# Altium PCB NEO_LAMP_PCB.PcbDoc
Units mm, origin at the board's own origin, x right, y up, seen from the top; angles counter-clockwise.
Board outline 40 x 40 mm, 2 copper layers (Top Layer, Bottom Layer), stack 1.57 mm thick; 59 components, 42 nets, 210 pads, 48 vias.
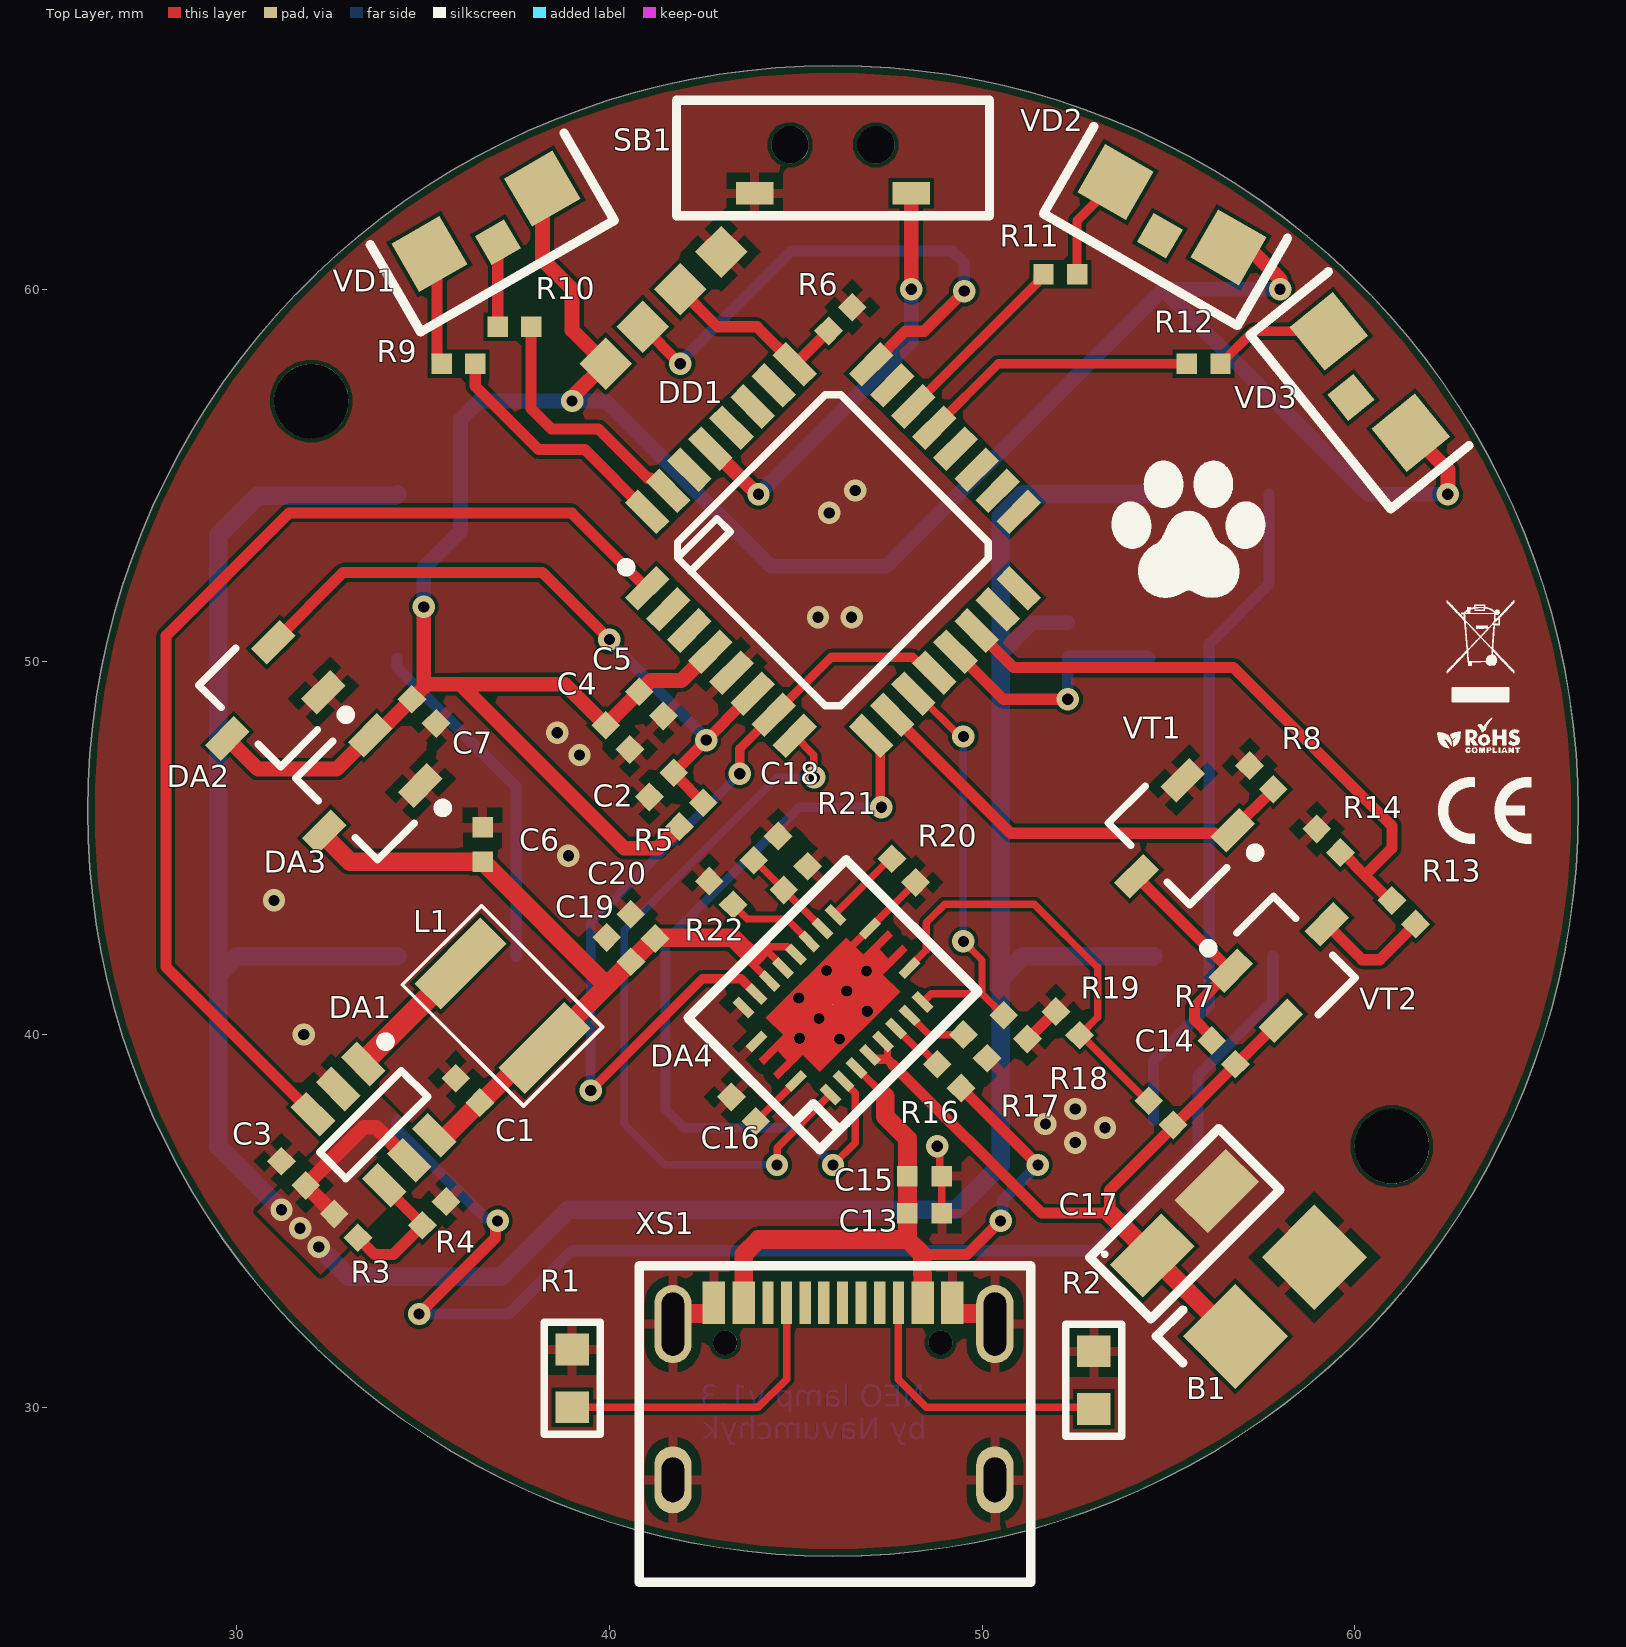
[diagram p0: Top Layer view]
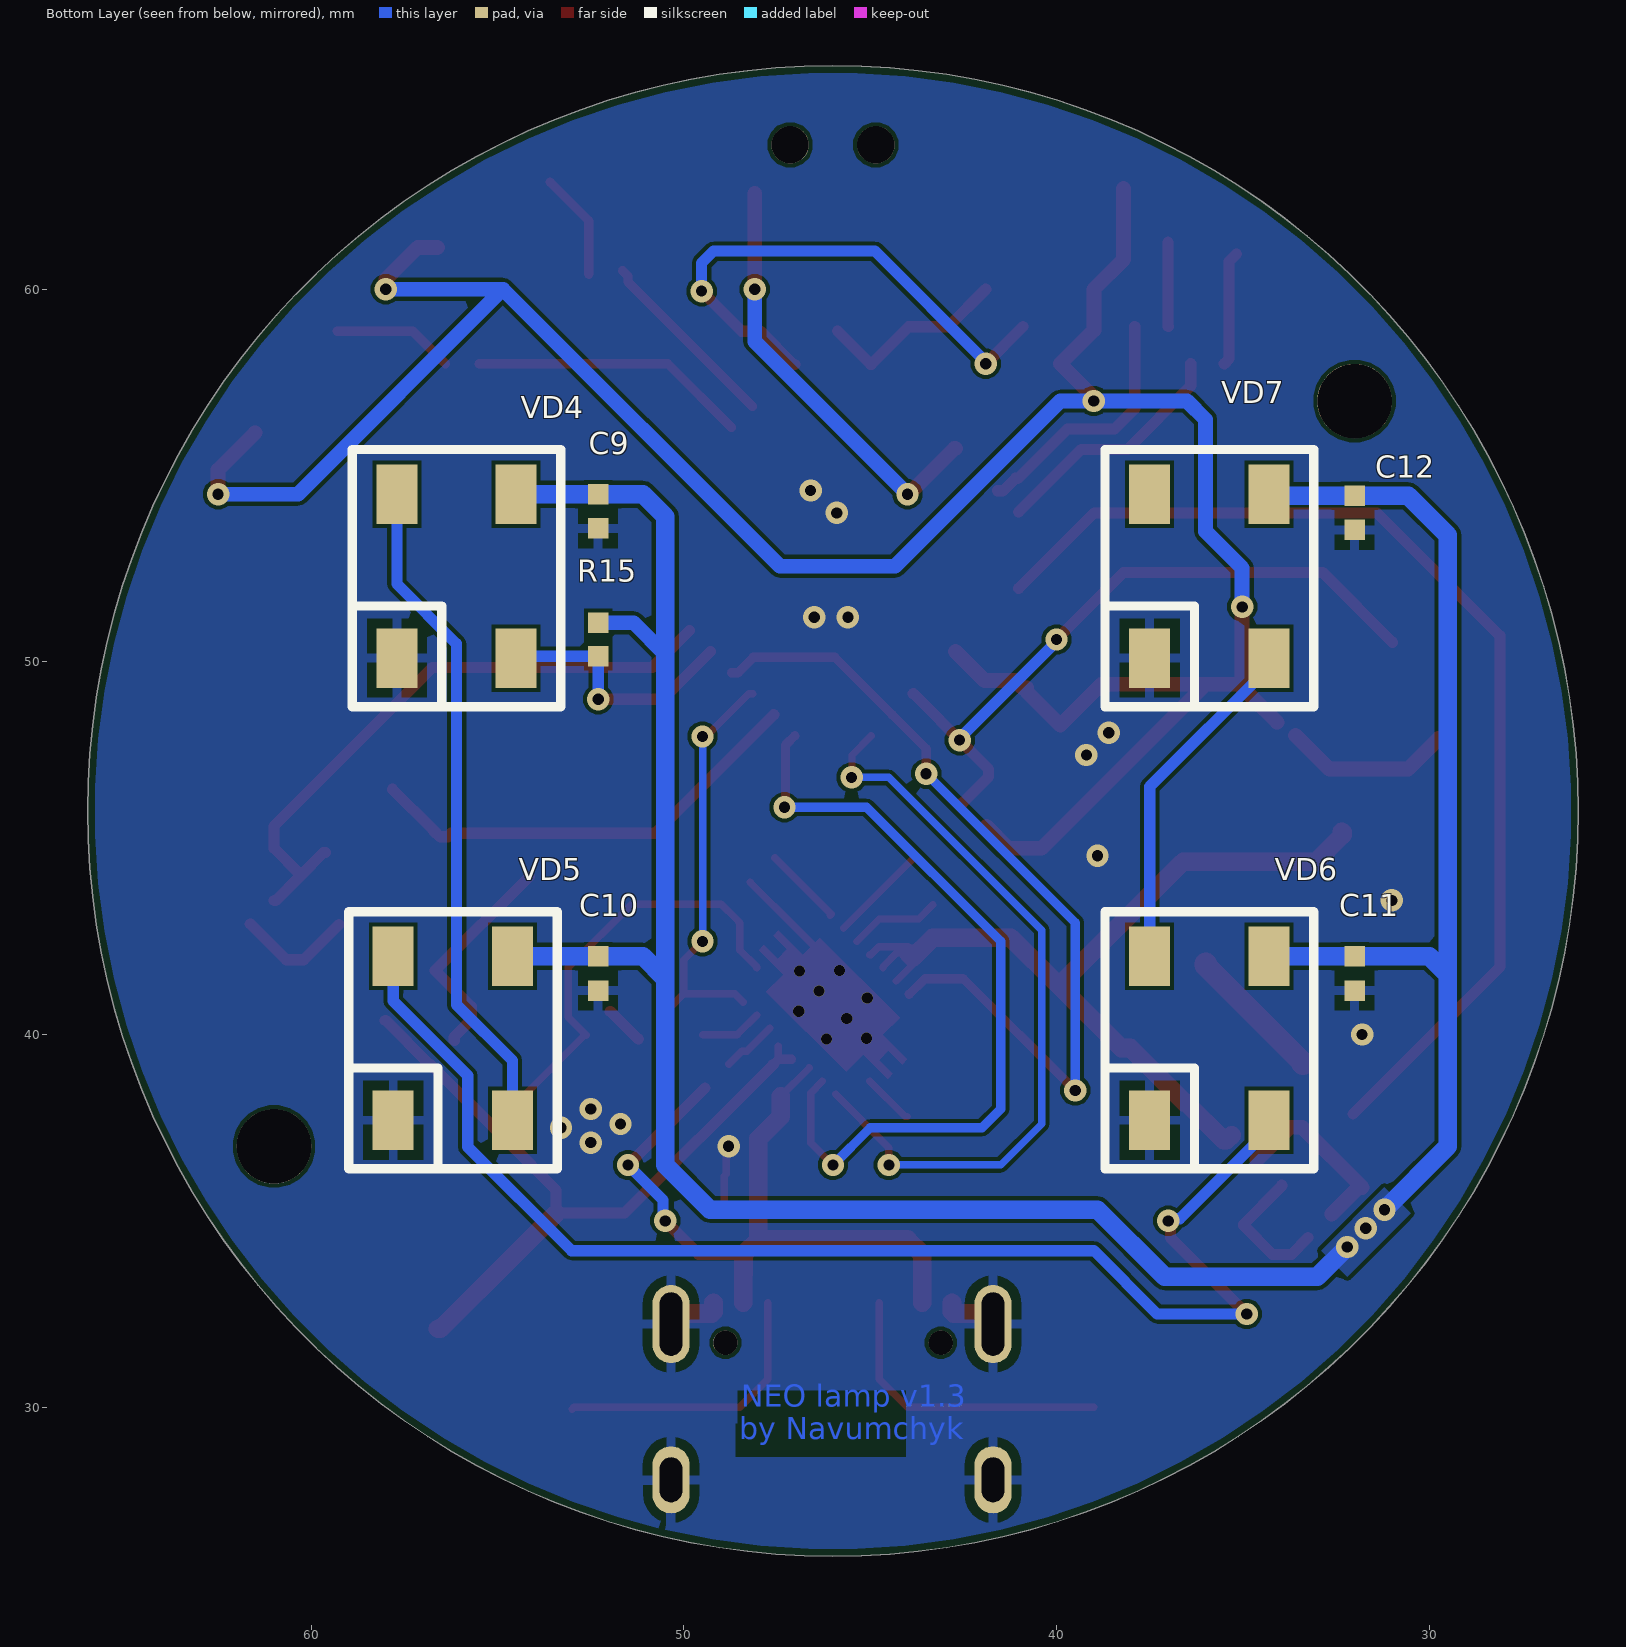
[diagram p1: Bottom Layer view, seen from below]
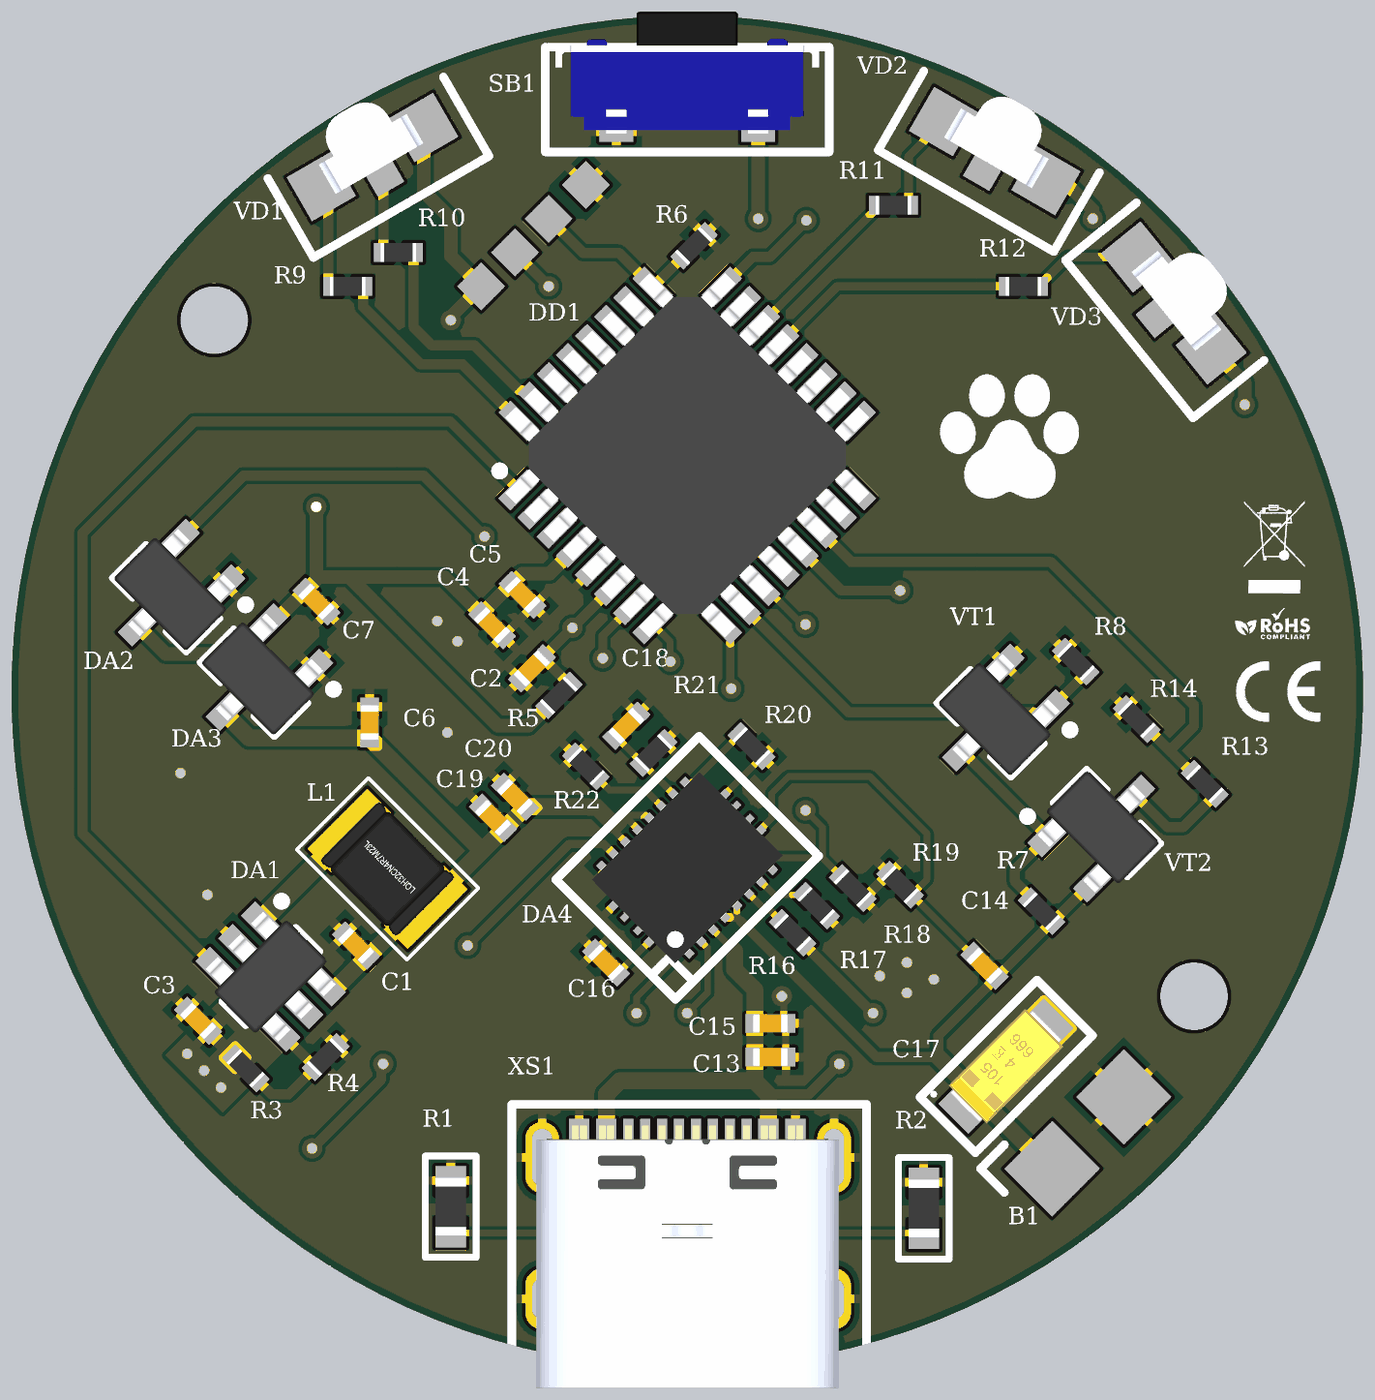
[diagram p2: 3D render of the assembled board from above, using the file's embedded part models]
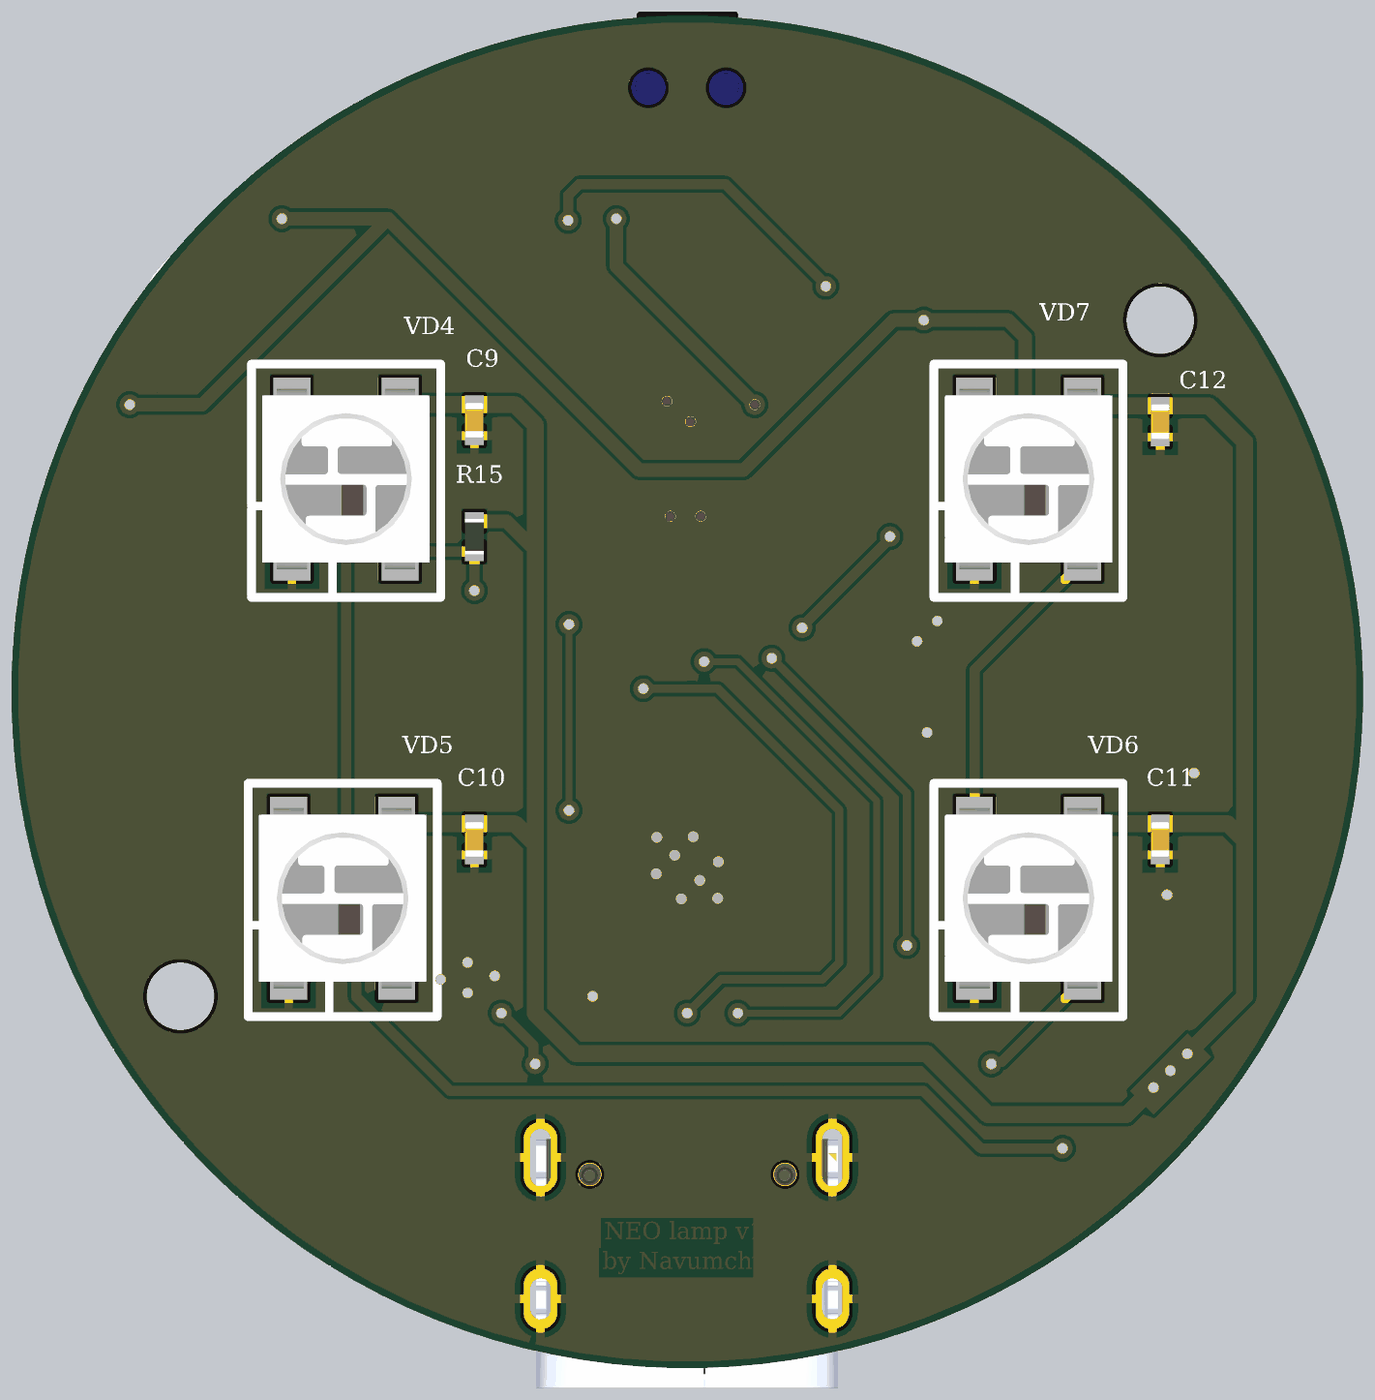
[diagram p3: 3D render of the assembled board from below, using the file's embedded part models]

## Layer stack, top to bottom
Top Solder: solder mask 0.0254, SM-001, Dk 4
Top Layer: signal copper 0.035
Dielectric 1: dielectric 1.5, FR-4, Dk 4.8
Bottom Layer: signal copper 0.035
Bottom Solder: solder mask 0.0254, SM-001, Dk 4

## Board outline
46,26 cw(c46,46) 26,46 cw(c46,46) 46,66 cw(c46,46) 66,46 cw(c46,46)

## Design rules (kind name [scope] priority, off if disabled: settings)
Clearance [All] p1: gap=0.1 ignorepadtopadclearanceinfootprint=FALSE
MinimumSolderMaskSliver [All] p1: minsoldermaskwidth=0.1
PolygonConnect [All] p1: connectstyle=Direct reliefconductorwidth=0.254 reliefentries=4 polygonreliefangle="90 Angle" airgapwidth=0.254
RoutingVias [All] p1: holewidth=0.3 width=0.6 viastyle="Through Hole" minholewidth=0.3 minwidth=0.6 maxholewidth=0.3 maxwidth=0.6
SilkToSolderMaskClearance [IsPad] p1: minsilkscreentomaskgap=0.1 clearancetoexposedcopper=TRUE
SolderMaskExpansion [All] p1: expansion=0.102 istentingtop=FALSE
Width [All] p1: maxlimit=0.6 minlimit=0.2 preferedwidth=0.4
28 further rules are at their usual default settings.

## Classes and differential pairs
component class LEDS: C9 C10 C11 C12 R15 VD4 VD5 VD6 VD7
component class "Control block": C1 C2 C3 C4 C5 C6 C7 DA1 DA2 DA3 DD1 L1 R1 R2 R3 R4 R5 R6 R7 R8 R9 R10 R11 R12 R13 R14 SB1 VD1 VD2 VD3 VT1 VT2 XS1
component class charge_block: B1 C13 C14 C15 C16 C17 C18 C19 C20 DA4 R16 R17 R18 R19 R20 R21 R22

## Components (designator, comment, footprint, x,y, rotation, side; value= is the part's Value field where it differs from the comment)
B1 "BAT" BAT_CONT 56.8,31.9 r45 top
C1 "10u" C0402 36.2,38.5 r315 top
C2 "1uF" C0402 41.4,46.7 r45 top
C3 "10u" C0402 31.525,36.275 r315 top
C4 "4.7u" C0402 40.225,47.975 r315 top
C5 "0.1u" C0402 41.125,48.875 r315 top
C6 "10u" C0402 36.6,45.1 r270 top
C7 "10u" C0402 35.025,48.675 r135 top
C9 "0.1u" C0402 52.3,54.04 r90 bottom locked
C10 "0.1u" C0402 52.3,41.64 r90 bottom locked
C11 "0.1u" C0402 32,41.64 r90 bottom locked
C12 "0.1u" C0402 32,54 r90 bottom locked
C13 "10u" C0402 48.46,35.2 r0 top
C14 "0.22u" C0402 54.8,37.9 r135 top
C15 "0.1u" C0402 48.46,36.2 r0 top
C16 "0.1u" C0402 43.6,38 r135 top
C17 "100u" "CAP TA 3216" 55.434,34.934 r45 top
C18 "0.22u" C0402 44.2,45 r225 top
C19 "10u" C0402 40.254,42.279 r135 top
C20 "0.1u" C0402 40.9,42.9 r135 top
DA1 "TPS61071" SOT23-6 33.674,37.583 r315 top
DA2 "MAX809" SOT23-3 30.7,48.9 r225 top
DA3 "XC6206" SOT23-3 33.3,46.4 r225 top
DA4 "BQ24070RHL" "VQFN20 (3.5*4.5)" 46,40.8 r135 top
DD1 "STM32G030K6T6" LQFP32 46,53 r45 top
L1 "Inductor" LQH32CN100K23 38.263,39.637 r135 top
R1 "5.1k" 0603 39,30.775 r270 top
R2 "5.1k" 0603 53,30.725 r270 top
R3 "1.8M" 0402 32.932,34.868 r315 top
R4 "200k" 0402 35.3,35.2 r225 top
R5 "10k" 0402 42.2,45.9 r45 top
R6 "10k" 0402 46.2,59.2 r225 top
R7 "100k" 0402 56.482,39.518 r315 top
R8 "100 k" 0402 57.5,46.9 r315 top
R9 "1k" 0402 35.95,58 r180 top
R10 "1k" 0402 37.45,59 r180 top
R11 "1k" 0402 52.1,60.4 r0 top
R12 "1k" 0402 55.95,58 r0 top
R13 "10k" 0402 61.318,43.282 r315 top
R14 "10k" 0402 59.3,45.2 r315 top
R15 "10k" 0402 52.3,50.6 r90 bottom
R16 "100k" 0402 49.118,38.882 r135 top
R17 "100k" 0402 49.818,39.682 r135 top
R18 "100k" 0402 50.9,40.2 r135 top
R19 "8.2k" 0402 52.3,40.3 r315 top
R20 "10k" 0402 47.9,44.4 r135 top
R21 "37k" 0402 45,44.2 r225 top
R22 "30k" 0402 43,43.8 r315 top
SB1 "Button" KLS7-TS3606 46,62.575 r0 top
VD1 "LED Duble" APBA3010SYKCGKC-GX 36.684,61.825 r30 top
VD2 "Red" KPA-3010SGC 55.1,62 r330 top
VD3 "Red" KPA-3010SGC 60.405,57.509 r309 top
VD4 "ws2812b 5050" "LED 5050 WS2812B" 54.5,54.5 r270 bottom locked
VD5 "ws2812b 5050" "LED 5050 WS2812B" 54.6,42.1 r270 bottom locked
VD6 "ws2812b 5050" "LED 5050 WS2812B" 34.3,42.1 r270 bottom locked
VD7 "ws2812b 5050" "LED 5050 WS2812B" 34.3,54.5 r270 bottom locked
VT1 "BSS138" SOT23-3 55.1,45.2 r225 top
VT2 "IRLML6402" SOT23-3 58.3,42 r45 top
XS1 "USB C" "USB C 16" 46,30.5 r180 top

## Footprints (in the part's own frame and the unit in brackets; to place one, negate y for a bottom-side part, rotate by r counter-clockwise, add the part's x,y. Pads: shape width x height; smd on the part's side, far side on the other; paste and mask are expansions set on the pad)
0402 [mm] "Chip Resistor, 2-Leads, Body 1,00x0,50mm, IPC Medium Density"
  rect 0.55x0.55 smd: 1(-0.45,0) 2(0.45,0)
  body extent -0.53,-0.28 0.53,0.28, height 0.4
0603 [mm] "Chip Resistor, 2-Leads, Body 1,60x0,80mm, IPC Medium Density"
  rect 0.85x0.9 smd: 1(-0.775,0) 2(0.775,0)
  silkscreen extent -1.5,-0.75 1.5,0.75, body extent -0.85,-0.45 0.85,0.45, height 0.55
APBA3010SYKCGKC-GX [mm]
  rect 1.5x1.5 smd: 1(1.75,0) 3(-1.75,0)
  rect 0.9x0.9 smd: 2(0,-0.65)
  silkscreen extent -3,-1.7 3,1, body extent -1.49,-0.4 1.51,1.6, height 0.99
BAT_CONT [mm]
  rect 2x2 smd: 1(0,0) 2(3,0)
  silkscreen extent -1.5,0.5 -0.5,1.5
C0402 [mm] "Chip Capacitor, 2-Leads, Body 1,00x0,50mm, IPC Medium Density"
  rect 0.55x0.55 smd: 1(-0.46,0) 2(0.46,0)
  body extent -0.53,-0.28 0.53,0.28, height 0.4
"CAP TA 3216" [mm] "Molded Capacitor, 2-Leads, Body 3,20x1,60mm, IPC Medium Density"
  rect 1.95x1.25 smd: 1(-1.225,0) 2(1.225,0)
  silkscreen extent -2.45,-1.17 2.45,1.15, body extent -1.73,-0.8 1.73,0.8, height 1.64
KLS7-TS3606 [mm]
  round 1 hole 1 unplated: 0(-1.15,1.3) 0(1.15,1.3)
  rect 1x0.6 smd: 1(-2.1,0) 2(2.1,0)
  silkscreen extent -4.2,-0.6 4.2,2.5, body extent -3.9,-0.05 3.9,3.55, height 3.5
KPA-3010SGC [mm] "3.0 x 1.0 mm Right Angle SMD Chip LED Lamp"
  rect 0.9x0.9 smd: 0(0,-0.65)
  rect 1.5x1.5 smd: 1(-1.75,0) 2(1.75,0)
  silkscreen extent -3,-1.7 3,1, body extent -1.5,-0.4 1.5,1.6, height 0.99
"LED 5050 WS2812B" [mm]
  rect 1.6x1.1 smd: 1(0,0) 2(0,-3.2) 3(4.4,-3.2) 4(4.4,0)
  silkscreen extent -1.2,-4.4 5.7,1.2, body extent -0.48,-4.07 4.88,0.87, height 1.7
LQFP32 [mm] "CQFP, 32-Leads, Body 9,00x9,00mm, Pitch 0,80mm, IPC Medium Density"
  rect 1.2x0.5 smd: 1(-4.25,2.8) 2(-4.25,2) 3(-4.25,1.2) 4(-4.25,0.4) 5(-4.25,-0.4) 6(-4.25,-1.2) 7(-4.25,-2) 8(-4.25,-2.8) 17(4.25,-2.8) 18(4.25,-2) 19(4.25,-1.2) 20(4.25,-0.4) 21(4.25,0.4) 22(4.25,1.2) 23(4.25,2) 24(4.25,2.8)
  rect 0.5x1.2 smd: 9(-2.8,-4.25) 10(-2,-4.25) 11(-1.2,-4.25) 12(-0.4,-4.25) 13(0.4,-4.25) 14(1.2,-4.25) 15(2,-4.25) 16(2.8,-4.25) 25(2.8,4.25) 26(2,4.25) 27(1.2,4.25) 28(0.4,4.25) 29(-0.4,4.25) 30(-1.2,4.25) 31(-2,4.25) 32(-2.8,4.25)
  silkscreen extent -4.37,-3.1 3.1,3.72, body extent -4.6,-4.6 4.6,4.6, height 1.45
LQH32CN100K23 [mm]
  rect 1x2.5 smd paste-2539.97 mask+0.1: 1(0,0) 2(3.2,0)
  silkscreen extent -0.7,-1.5 3.9,1.5, body extent 0,-1.25 3.2,1.25, height 2
SOT23-3 [mm]
  rect 1.1x0.6 smd: 1(-1.35,0.95) 2(-1.35,-0.95) 3(1.35,0)
  silkscreen extent -1.47,-1.55 0.88,1.92, body extent -1.53,-1.53 1.53,1.53, height 1.1
SOT23-6 [mm]
  rect 1.1x0.6 smd: 1(-1.35,0.95) 2(-1.35,0) 3(-1.35,-0.95) 4(1.35,-0.95) 5(1.35,0) 6(1.35,0.95)
  silkscreen extent -1.47,-1.55 0.5,1.92, body extent -1.53,-1.53 1.53,1.53, height 1.1
"USB C 16" [mm]
  round 0.65 hole 0.65: 0(-2.885,-1.23) 0(2.895,-1.23)
  rect 0.6x1.14 smd: 1(-3.205,-2.3) 2(-2.405,-2.3) 11(2.395,-2.3) 12(3.195,-2.3)
  rect 0.3x1.14 smd: 3(-1.755,-2.3) 4(-1.255,-2.3) 5(-0.755,-2.3) 6(-0.255,-2.3) 7(0.245,-2.3) 8(0.745,-2.3) 9(1.245,-2.3) 10(1.745,-2.3)
  oval 1x2.1 hole 1.7 slot 0.6 at 0 deg: 13(4.295,-1.73) 14(-4.345,-1.73)
  oval 1x1.8 hole 1.2 slot 0.6 at 0 deg: 15(4.295,2.45) 16(-4.345,2.45)
  silkscreen extent -5.31,-3.3 5.19,5.2, body extent -4.47,-2.67 4.47,5.08, height 3.26
"VQFN20 (3.5*4.5)" [mm] "For BQ24070"
  rect 0.24x0.6 smd: 1(-0.75,2.15) 10(-0.75,-2.15) 11(0.75,-2.15) 20(0.75,2.15)
  rect 0.6x0.24 smd: 2(-1.65,1.75) 3(-1.65,1.25) 4(-1.65,0.75) 5(-1.65,0.25) 6(-1.65,-0.25) 7(-1.65,-0.75) 8(-1.65,-1.25) 9(-1.65,-1.75) 12(1.65,-1.75) 13(1.65,-1.25) 14(1.65,-0.75) 15(1.65,-0.25) 16(1.65,0.25) 17(1.65,0.75) 18(1.65,1.25) 19(1.65,1.75)
  round 0.025 smd: 20(0,0)
  Top Layer region: -1.025,1.525 -1.025,-1.525 -0.375,-1.52 -0.375,-2.45 -0.175,-2.45 -0.175,-1.925 0.175,-1.925 0.175,-2.45 0.375,-2.45 0.375,-1.52 1.025,-1.52 1.025,1.52 0.375,1.52 0.375,2.45 0.175,2.45 0.175,1.925 -0.175,1.925 -0.175,2.45 -0.375,2.45 -0.375,1.52
  silkscreen extent -2.5,-3 2.5,3, body extent -1.76,-2.26 1.76,2.26, height 1

## Part data
C1 C2 C3 C4 C5 C6 C7 C9 C10 C11 C12 C13 C14 C15 C16 C18 C19 C20: library part Capacitor
C17: library part "Capacitor Pol"
DA1: library part TPS6107x, "Efficient Synchronous Boost Converter"
DA3: library part "LDO XC6206"
R1 R2 R3 R4 R5 R6 R7 R8 R9 R10 R11 R12 R13 R14 R15 R16 R17 R18 R19 R20 R21 R22: library part Resistor
VD2 VD3: library part LED
VT1: library part N-MOSFET
VT2: library part P-MOSFET
XS1: library part "USB C 16"

## Free pads (board coordinates)
  rect 1x1 smd rot 45: 4(41.9,60) 6(40.9,59) 7(39.9,58) 8(43,61)
  round 2 hole 2 unplated: 9(61,37) 10(32,57)

## Via types
v1: diameter 0.6, hole 0.3, Top Layer to Bottom Layer, tented both sides, 40 vias
v2: diameter 0.3, hole 0.3, Top Layer to Bottom Layer, tented both sides, 8 vias

## Nets (pads, with @x,y where several pads share a name; then routed paths per layer and width w, separated by ;. In a path a pad name is that pad's centre, name@x,y a point inside that pad or via, vN(x,y) a via of type N, cw(c..) or ccw(c..) an arc to the next point about the centre after c; other vN are vias at no path point)
5VEN: DA1.3 DD1.1 | length 29.6
  Top Layer w0.3: DA1.3 28.1,41.813 28.1,50.7 31.4,54 38.99,54 DD1.1
+3V3: C4.1 C5.1 C7.2 DA2.3 DA3.2 DD1.4 pad.7 R5.1 VD1.1 VD2.2 VD3.2 | length 78.3
  Top Layer w0.4: DA2.3 30.566,47.125 32.681,47.125 DA3.2 ; 34.081,48.381 C7.2 35.1,49.4 36,49.4 ; 35.018,49.318 v1(35.018,51.477) ; VD1.1 38.2,60.8 39,60 39,58.9 pad.7 39.038,57.138 39.038,57.038 v1(39,57) ; C5.1 C4.1 38.8,49.4 36,49.4 ; C5.1@40.8,49.3 40.906,49.3 41.106,49.5 41.934,49.5 DD1.4 ; R5.1 41.3,45 40.4,45 36,49.4 ; VD2.2 57.141,61.125 58,60.266 v1(58,60) ; VD3.2 62.5,55.156 v1(62.5,54.5)
  Bottom Layer w0.4: v1(35.018,51.477) 35.018,52.518 36,53.5 36,56.5 36.5,57 v1(39,57) 39.9,57 44.334,52.566 47.423,52.566 54.857,60 ; v1(58,60) 54.857,60 ; v1(62.5,54.5) 60.357,54.5 54.857,60
+5CHG: C13.1 C15.1 DA4.4 R16.1 XS1.2 XS1.11 | length 20.2
  Top Layer w0.2: DA4.4 47.4,38.339
  Top Layer w0.3: 48.4,34.1 49.6,34.1 v1(50.5,35) ; R16.1 v1(51.5,36.5)
  Top Layer w0.5: XS1.11 43.605,34.105 44,34.5 48,34.5 ; 47.4,38.339 47.4,37.8 48,37.2 C15.1 C13.1 48,34.5 ; XS1.2 48.405,33.577 48.4,33.582 48.4,34.1 48,34.5
  Bottom Layer w0.3: v1(50.5,35) 50.557,35.057 50.557,35.557 v1(51.5,36.5)
+5V: C3.2 C9.2 C10.2 C11.2 C12.2 DA1.5 R3.1 R15.2 VD4.1 VD5.1 VD6.1 VD7.1 | length 82
  Top Layer w0.4: C3.2@31.8,35.9 33.413,37.513 33.744,37.513 DA1.5 ; C3.2 32,35.8 R3.1
  Bottom Layer w0.4: 50.5,50.2 51.35,51.05 R15.2
  Bottom Layer w0.5: v1(31.2,35.3) 29.5,37 29.5,41.6 ; v1(32.2,34.3) 33,33.5 37.1,33.5 38.9,35.3 49.3,35.3 50.5,36.5 50.5,41.5 ; VD6.1 C11.2 30,42.1 29.5,41.6 ; VD7.1 34.26,54.46 C12.2 30.56,54.46 29.5,53.4 29.5,41.6 ; VD4.1 C9.2 51.1,54.5 50.5,53.9 50.5,50.2 50.5,41.5 ; VD5.1 C10.2 51.1,42.1 50.5,41.5
  other v1: 31.7,34.8
ADC: DD1.14 R13.1 R14.2 | length 16.9
  Top Layer w0.3: DD1.14 50.849,49.848 56.752,49.848 61,45.6 61,45 60.309,44.309 60.309,44.241 ; R14.2 59.668,44.882 60.309,44.241 ; R13.1 60.95,43.6 60.309,44.241
BAT: B1.1 C14.1 C17.1 DA4.5 DA4.6 R7.2 VT2.2 | length 19.9
  Top Layer w0.2: 47.464,39.336 DA4.6@47.464,39.69
  Top Layer w0.25: DA4.5@47.11,39.336 47.464,39.336 47.6,39.2
  Top Layer w0.3: 47.6,39.2 51.593,35.207 53.428,35.207 53.428,35.828 54.75,37.15 R7.2 56.822,39.2 57.995,40.374 VT2.2
  Top Layer w0.5: 53.428,35.207 C17.1 56.535,32.1 B1.1@56.6,32.1
CHG_OUT: C1.2 C6.2 C19.1 C20.1 DA1.6 DA3.3 DA4.15 DA4.16 DA4.17 L1.1 | length 23.4
  Top Layer w0.2: 43.858,42.058 43.853,42.053 43.853,41.887 DA4.17 ; 43.992,42.192 44.283,42.192 44.656,41.818 DA4.16 ; 43.992,42.353 44.773,42.353 44.982,42.144 DA4.15
  Top Layer w0.5: DA3.3 32.325,45.425 32.325,45.354 33.04,44.64 C6.2 ; DA1.6 35.44,37.16 35.511,37.16 C1.2 36.561,38.175 38.023,39.637 L1.1 39.933,41.307 ; C6.2@36.625,44.615 39.933,41.307 ; 43.992,42.192 43.858,42.058 43.323,42.593 43.111,42.593 43.104,42.6 41.225,42.6 39.933,41.307
EN-ADC: DD1.10 R8.2 VT1.1 | length 12.1
  Top Layer w0.3: DD1.10 50.772,45.4 56.243,45.4 56.337,45.306 56.55,45.306 VT1.1 ; VT1.1 57.818,46.578 R8.2
GND: B1.2 C1.1 C2.1 C3.1 C4.2 C5.2 C6.1 C7.1 C9.1 C10.1 C11.1 C12.1 C13.2 C15.2 C16.2 C17.2 C18.1 C19.2 C20.2 DA1.2 DA2.1 DA3.1 DA4.11 DA4.19 DA4.20 DD1.5 pad.8 R1.1 R2.1 R4.1 R6.1 R8.1 R14.1 R17.1 R18.1 R19.1 R20.1 R21.1 R22.1 SB1.1 VD4.3 VD5.3 VD6.3 VD7.3 VT1.2 XS1.1 XS1.12 XS1.13 XS1.14 XS1.15 XS1.16 | length 10.2
  Top Layer w0.2: DA4.20@46,40.8 46,41.861 DA4.11 46.99,42.852 48.218,44.08 R20.1 ; v1(48.8,37) 48.86,36.94 48.86,36.26 C15.2 C13.2
  Top Layer w0.3: R18.1 51.232,39.882 51.968,40.618 R19.1
  Top Layer w0.5: XS1.13 41.705,32.284 41.936,32.515 42.755,32.515 42.805,32.565 XS1.12 ; XS1.1 49.205,32.565 49.255,32.515 50.114,32.515 50.345,32.284 XS1.14
  other v1: 52.5,37.1 53.3,37.5 51.7,37.6 52.5,38 31.8,40 31,43.6 38.9,44.8 39.2,47.5 38.6,48.1 45.6,51.2 46.5,51.2 45.9,54 46.6,54.6
  other v2: 46.177,39.881 45.098,39.898 45.629,40.429 46.919,40.623 45.081,40.977 46.371,41.171 45.823,41.719 46.902,41.702
NetC2_2: C2.2 DA2.2 DD1.6 R5.2 | length 18.4
  Top Layer w0.3: DA2.2 32.856,52.4 38.2,52.4 v1(40,50.6) ; R5.2 41.825,46.911 41.825,47.125 42.4,47.7 42.4,47.703 DD1.6
  Bottom Layer w0.3: v1(40,50.6) 40,50.55 42.6,47.95 v1(42.6,47.9)
NetC14_2: C14.2 DA4.10 R19.2 | length 11.5
  Top Layer w0.2: DA4.10 48.051,41.818 48.5,42.268 48.5,43 48.6,43.1 49,43.5 51.4,43.5 53.1,41.8 53.1,40.464 R19.2 52.668,39.982 54.425,38.225 C14.2
NetC16_1: C16.1 DA4.1 | length 1.4
  Top Layer w0.2: C16.1@44,37.8 44.061,37.8 DA4.1
NetC18_2: C18.2 DA4.13 R21.2 | length 2.6
  Top Layer w0.2: C18.2@43.884,44.684 DA4.13
NetDA1_1: DA1.1 L1.2 | length 3.8
  Top Layer w0.6: DA1.1 33.37,39.23 36,41.859 L1.2
NetDA1_4: DA1.4 R3.2 R4.2 | length 3.7
  Top Layer w0.3: R3.2 33.7,34.1 34.2,34.1 R4.2 34.982,34.906 33.956,35.932 DA1.4
NetDA4_2: DA4.2 DD1.8 | length 20.4
  Top Layer w0.2: v1(44.5,36.5) 44.5,36.967 DA4.2 ; DD1.8 45.49,47.5 45.49,46.91 v1(45.5,46.9)
  Bottom Layer w0.2: v1(44.5,36.5) 41.5,36.5 40.4,37.6 40.4,42.8 44.5,46.9 v1(45.5,46.9)
NetDA4_3: DA4.3 DD1.9 | length 21.6
  Top Layer w0.2: v1(46,36.5) 46.601,37.101 46.601,38.424 46.283,38.742 DA4.3
  Top Layer w0.25: DD1.9 47.273,47.767 47.273,46.127 v1(47.3,46.1)
  Bottom Layer w0.25: v1(46,36.5) 45,37.5 42,37.5 41.5,38 41.5,42.5 45.1,46.1 v1(47.3,46.1)
NetDA4_7: DA4.7 R16.2 | length 1.5
  Top Layer w0.2: DA4.7 48.311,39.55 48.45,39.55 R16.2
NetDA4_8: DA4.8 R17.2 | length 1.7
  Top Layer w0.2: DA4.8 48.568,40 R17.2
NetDA4_9: DA4.9 DD1.11 R18.2 | length 11.4
  Top Layer w0.2: DD1.11 48.255,49.146 49.401,48 v1(49.5,48) ; DA4.9 48.633,41.1 50,41.1 ; v1(49.5,42.5) 50,42 50,41.1 ; R18.2 50,41.1
  Bottom Layer w0.2: v1(49.5,42.5) v1(49.5,48)
NetDA4_12: DA4.12 R20.2 | length 2.2
  Top Layer w0.2: DA4.12 46.049,43.226 46.049,43.233 R20.2@47.558,44.742
NetDA4_14: DA4.14 R22.2 | length 2.5
  Top Layer w0.2: R22.2 43.7,43.1 44.761,43.1 DA4.14
NetDA4_18: DA4.18 DD1.7 DD1.12 | length 23.1
  Top Layer w0.25: v1(39.5,38.5) 42.5,41.5 43.532,41.5 DA4.18 ; v1(43.5,47) 43.5,47.672 DD1.7 45.951,50.122 48.135,50.122 48.546,49.712 DD1.12
  Bottom Layer w0.25: v1(39.5,38.5) 39.5,43 v1(43.5,47)
NetDD1_13: DD1.13 R15.1 VD4.4 | length 6.9
  Top Layer w0.3: DD1.13 50.566,49 v1(52.3,49)
  Bottom Layer w0.3: v1(52.3,49) R15.1 54.45,50.15 VD4.4
NetDD1_29: DD1.29 SB1.2 | length 11.6
  Top Layer w0.4: DD1.29 42.745,55.722 43.967,54.5 v1(44,54.5) ; v1(48.1,60) SB1.2
  Bottom Layer w0.4: v1(44,54.5) 48.1,58.6 v1(48.1,60)
NetR1_2: R1.2 XS1.9 | length 8.1
  Top Layer w0.2: R1.2 44,30 44.755,30.755 XS1.9
NetR2_2: R2.2 XS1.3 | length 7.6
  Top Layer w0.2: XS1.3 47.755,30.745 48.5,30 52.95,30 R2.2
NetR7_1: R7.1 VT1.3 VT2.1 | length 6.1
  Top Layer w0.3: VT1.3 VT2.1 55.7,40.744 55.7,40.398 56.164,39.934 R7.1
NetR9_2: R9.2 VD1.3 | length 3.1
  Top Layer w0.3: VD1.3 35.375,60.744 35.375,58.125 R9.2
NetR10_2: R10.2 VD1.2 | length 2.3
  Top Layer w0.3: R10.2 37.005,59.005 37.005,61.257 VD1.2
NetR11_2: R11.2 VD2.1 | length 2.9
  Top Layer w0.25: R11.2 52.55,61.841 VD2.1
NetR12_2: R12.2 VD3.1 | length 3.3
  Top Layer w0.25: R12.2 57.269,58.869 VD3.1
NetR13_2: R13.2 VT2.3 | length 3.2
  Top Layer w0.3: VT2.3 60.2,42.009 60.682,42.009 R13.2
NetVD4_2: VD4.2 VD5.4 | length 18.1
  Bottom Layer w0.3: VD5.4 54.6,39.3 56.1,40.8 56.1,50.486 57.7,52.086 VD4.2
NetVD5_2: VD5.2 VD6.4 | length 36
  Top Layer w0.3: v1(34.895,32.5) 36.943,34.547 36.943,34.943 v1(37,35)
  Bottom Layer w0.3: VD6.4 34.3,37.45 36.693,35.057 36.943,35.057 v1(37,35) ; v1(34.895,32.5) 37.3,32.5 39,34.2 53.016,34.2 55.8,36.984 55.8,38.9 57.8,40.9 VD5.2
NetVD6_2: VD6.2 VD7.4 | length 9.3
  Bottom Layer w0.3: VD7.4 34.3,49.85 37.5,46.65 VD6.2
PL1: DD1.32 R9.1 | length 6.6
  Top Layer w0.3: R9.1 36.4,57.4 38.1,55.7 39.34,55.7 DD1.32
PL2: DD1.31 R10.1 | length 6.8
  Top Layer w0.3: R10.1 37.9,56.8 38.45,56.25 39.709,56.25 41.032,54.927 41.103,54.927 41.439,54.591 DD1.31
SL1: DD1.22 R11.1 | length 5.1
  Top Layer w0.25: DD1.22 51.5,60.197 51.5,60.35 R11.1@51.65,60.5
SL2: DD1.21 R12.1 | length 7.5
  Top Layer w0.25: DD1.21 50.434,58 R12.1
SWCLK: DD1.25 pad.4 R6.2 | length 5.2
  Top Layer w0.3: pad.4 42.907,58.993 43.967,58.993 DD1.25 44.985,57.985 R6.2
SWDIO: DD1.24 pad.6 | length 14.5
  Top Layer w0.3: pad.6 v1(41.9,58) ; DD1.24 47.06,57.985 47.95,58.875 48.45,58.875 v1(49.525,59.95)
  Bottom Layer w0.3: v1(41.9,58) 41.9,58.05 44.875,61.025 49.2,61.025 49.525,60.7 v1(49.525,59.95)
pads on no net: DD1.2 DD1.3 DD1.15 DD1.16 DD1.17 DD1.18 DD1.19 DD1.20 DD1.23 DD1.26 DD1.27 DD1.28 DD1.30 SB1.0 VD2.0 VD3.0 VD7.2 XS1.0 XS1.4 XS1.5 XS1.6 XS1.7 XS1.8 XS1.10

## Polygon pours and split planes (outlines as drawn)
GND on Top Layer "GND_L01_P003" (solid, remove dead copper, pour order 3): 32,60 ccw(c46,46) 32,32 ccw(c46,46) 60,32 ccw(c46,46) 60,60 ccw(c46,46)
+5V on Top Layer "+5V_L01_P000" (solid, pour order 0): 35.45,36.75 32.25,33.55 30.55,35.25 33.75,38.45
+5V on Bottom Layer "+5V_L02_P001" (solid, pour order 1): 31.2,35.9 30.5,35.2 32.2,33.5 32.9,34.2
GND on Bottom Layer "GND_L02_P004" (solid, remove dead copper, pour order 4): 32,60 cw(c46,46) 60,60 cw(c46,46) 60,32 cw(c46,46) 32,32 cw(c46,46)

## Other copper
Bottom Layer:
  text "NEO lamp v1.3" at 48.46,29.816 h1
  text "by Navumchyk" at 48.513,28.933 h1

## Silkscreen, mask and mechanical layers (free items; w line width, h text height)
Top Overlay:
  drawing of 25 lines, arcs and shapes, not listed
Mechanical 1:
  circle w0.254: c46,46 r20
  lines w1.2: 26,46 cw(c46,46) 46,66 cw(c46,46) 66,46 cw(c46,46) 46,26 cw(c46,46) 26,46